# Altium PCB 2026-11-21_20-42-41.PcbDoc
Units mil, origin at the board's own origin, x right, y up, seen from the top; angles counter-clockwise.
Board outline 1801 x 1800 mil, 4 copper layers (Top Layer, MidLayer1, MidLayer2, Bottom Layer); 14 components, 8 nets, 39 pads, 58 vias.
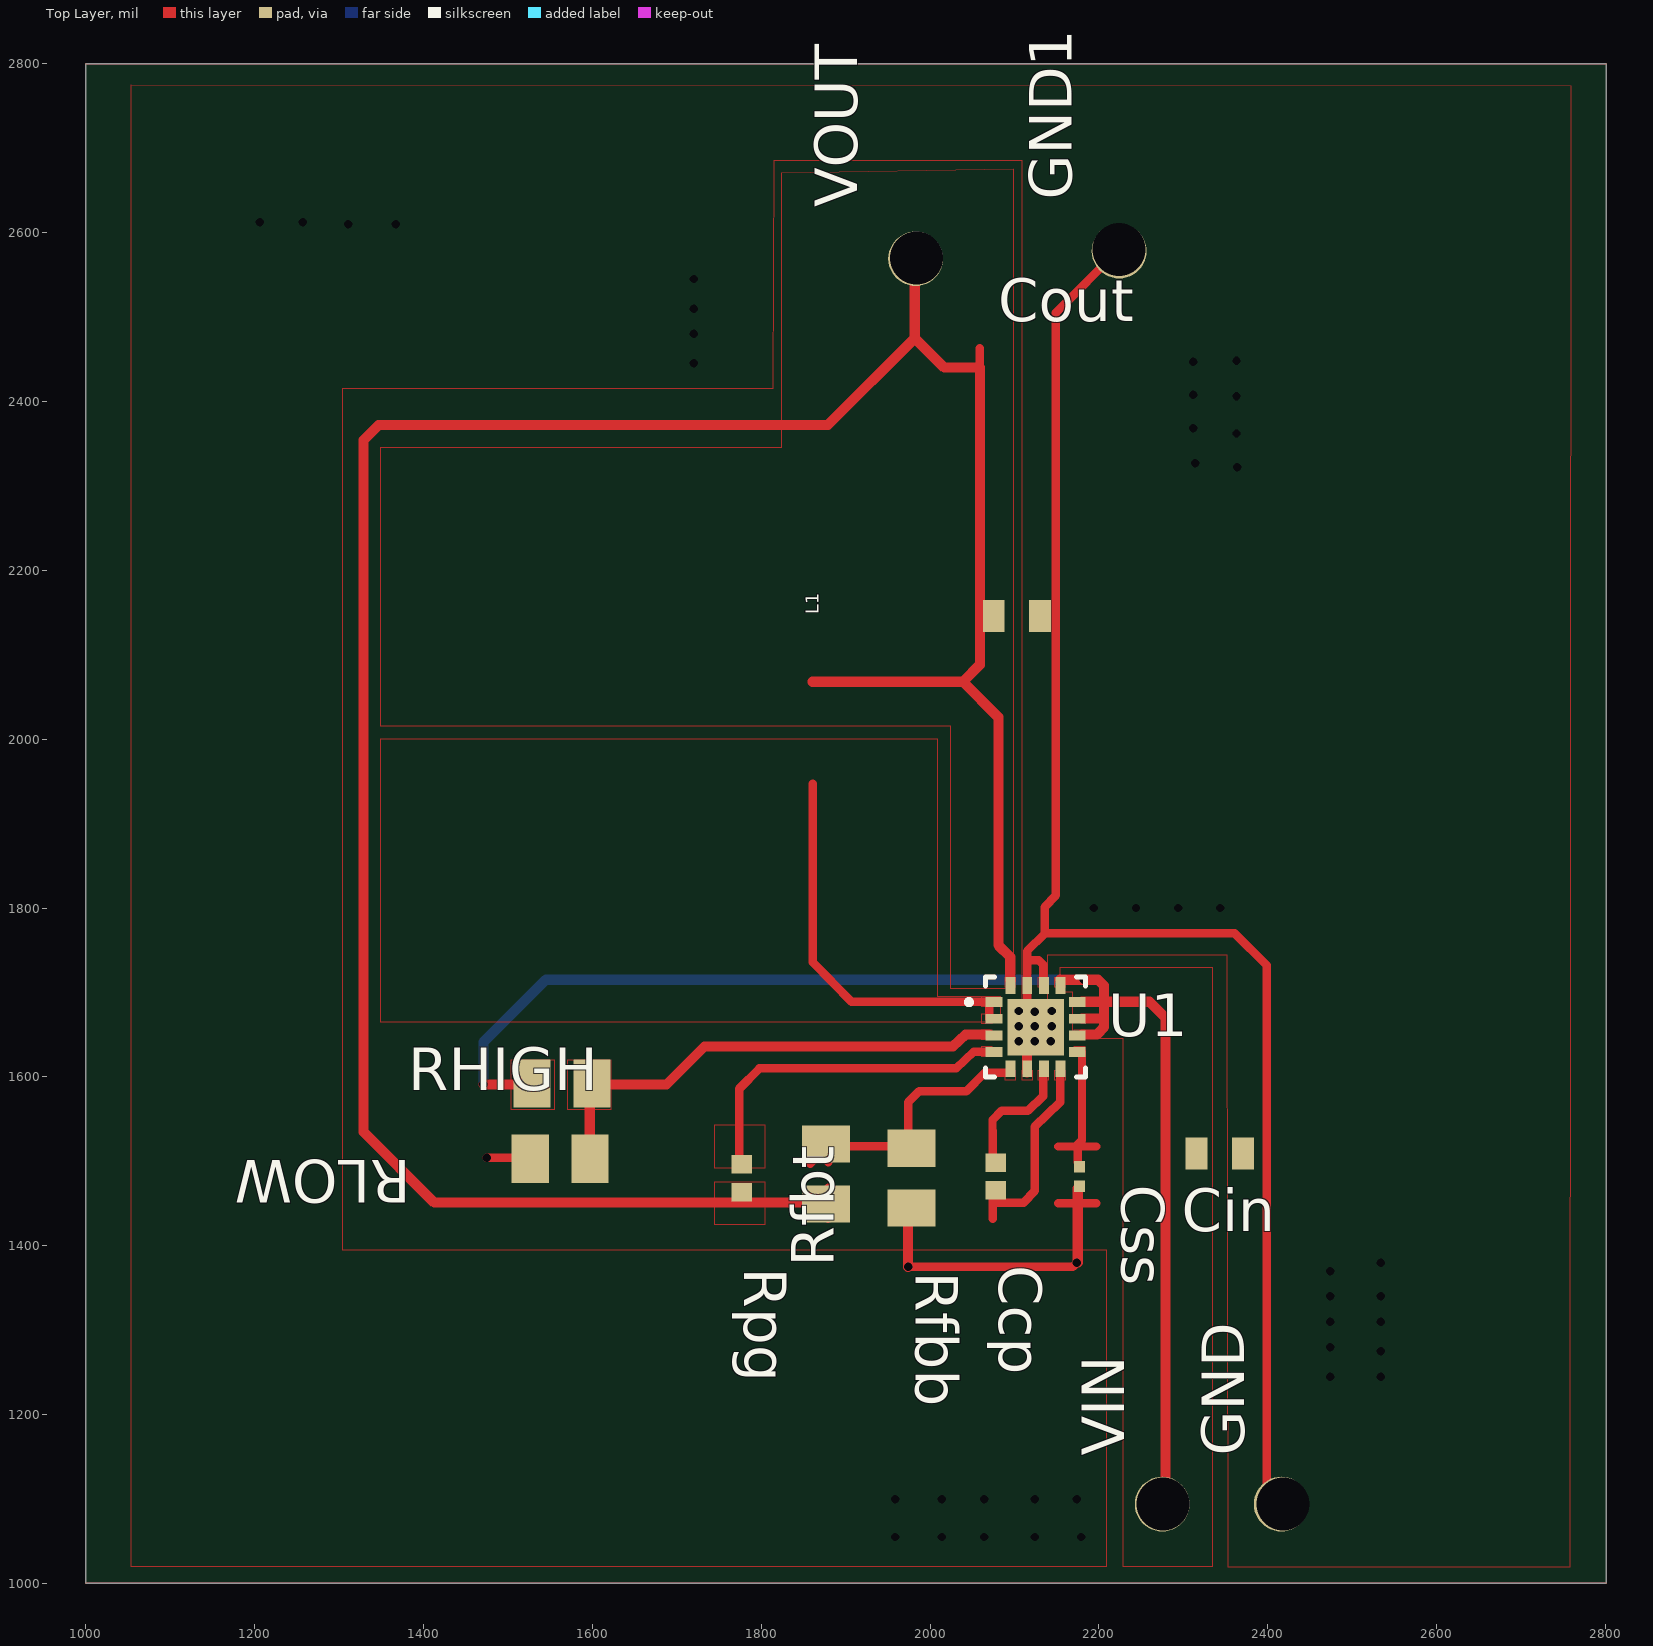
[diagram p0: Top Layer view]
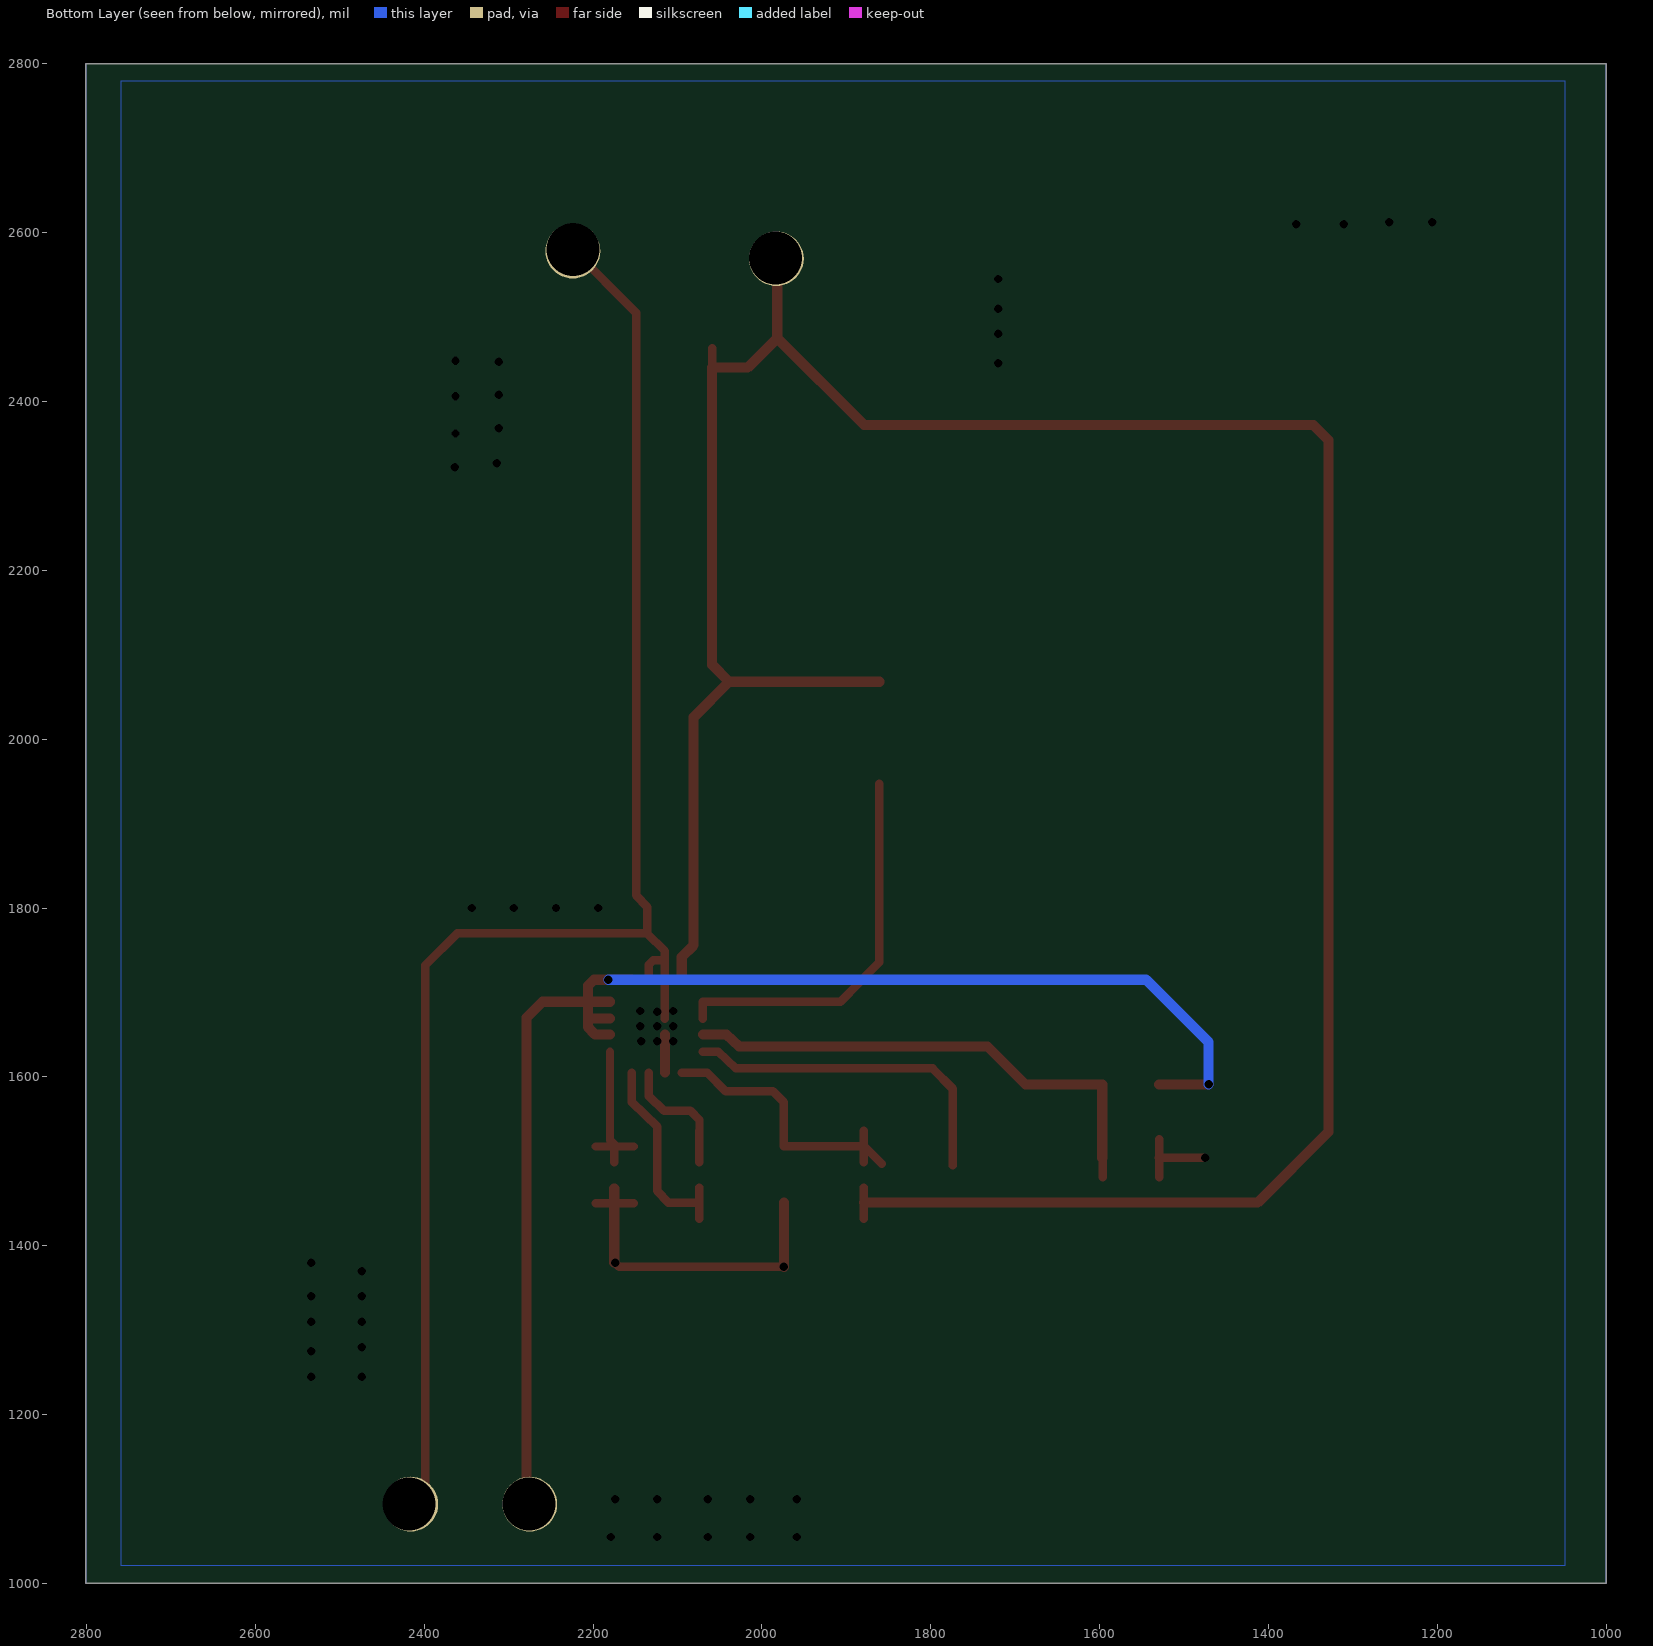
[diagram p1: Bottom Layer view, seen from below]

## Layer stack, top to bottom
Top Layer: signal copper 1.4
Dielectric: core 12.6, FR-4, Dk 4.8
MidLayer1: signal copper 1.4
Dielectric: prepreg 12.6, FR-4, Dk 4.8
MidLayer2: signal copper 1.4
Dielectric: core 12.6, FR-4, Dk 4.8
Bottom Layer: signal copper 1.4

## Board outline
1000,1000 2801,1000 2801,2800 1000,2800

## Design rules (kind name [scope] priority, off if disabled: settings)
PlaneConnect [All] p0: scope1count=1 scope1_0_kind=Board scope1_0_value=Board scope2count=1 scope2_0_kind=Board scope2_0_value=Board commentlength=0 planeconnectstyle=Direct reliefexpansion=20 reliefentries=4 reliefconductorwidth=10 reliefairgap=10
PlaneConnect [All] p1: planeconnectstyle=Direct reliefexpansion=20 reliefentries=4 reliefconductorwidth=10 reliefairgap=10
PolygonConnect [All] p0: scope1count=1 scope1_0_kind=Board scope1_0_value=Board scope2count=1 scope2_0_kind=Board scope2_0_value=Board commentlength=0 connectstyle=Direct reliefconductorwidth=10 reliefentries=4 polygonreliefangle="90 Angle"
PolygonConnect [All] p1: connectstyle=Direct reliefconductorwidth=10 reliefentries=4 polygonreliefangle="90 Angle"

## Components (designator, comment, footprint, x,y, rotation, side; value= is the part's Value field where it differs from the comment)
Ccp "" 0402 2078,1482 r270 top
Cin "" 0603 2343,1509 r0 top
Cout "" 0603 2103,2146 r0 top
Css "" 0201 2177,1482 r270 top
GND "" TP-1502 2416,1094 r90 top
GND1 "" TP-1502 2224,2578 r90 top
Rfbb "" 0805 1978,1480 r270 top
Rfbt "" 0805 1877,1485 r90 top
RHIGH "" 0805 1564,1592 r0 top
RLOW "" 0805 1562,1503 r180 top
Rpg "" 0402 1777,1480 r270 top
U1 "" S-PVQFN-N16 2125,1659 r0 top
VIN "" TP-1502 2275,1094 r90 top
VOUT "" TP-1502 1983,2569 r90 top

## Footprints (in the part's own frame and the unit in brackets; to place one, negate y for a bottom-side part, rotate by r counter-clockwise, add the part's x,y. Pads: shape width x height; smd on the part's side, far side on the other; paste and mask are expansions set on the pad)
0201 [mil]
  rect 14x13 smd: 1(-11.5,0) 2(11.5,0)
0402 [mil]
  rect 22x24 smd: 1(-16.5,0) 2(16.5,0)
0603 [mil]
  rect 26x38 smd: 1(-27.5,0) 2(27.5,0)
0805 [mil]
  rect 44x57 smd: 1(-35.5,0) 2(35.5,0)
S-PVQFN-N16 [mm]
  rect 0.5x0.3 smd: 1(-1.25,0.75) 2(-1.25,0.25) 3(-1.25,-0.25) 4(-1.25,-0.75) 9(1.25,-0.75) 10(1.25,-0.25) 11(1.25,0.25) 12(1.25,0.75)
  rect 0.3x0.5 smd: 5(-0.75,-1.25) 6(-0.25,-1.25) 7(0.25,-1.25) 8(0.75,-1.25) 13(0.75,1.25) 14(0.25,1.25) 15(-0.25,1.25) 16(-0.75,1.25)
  rect 1.7x1.7 smd: 17(0,0)
  silkscreen extent -2.08,-1.5 1.5,1.5
TP-1502 [mil]
  round 65 hole 32: 1(0,0)

## Via types
v1: diameter 0, hole 10, Top Layer to Bottom Layer, 54 vias
v2: diameter 0, hole 63, Top Layer to Bottom Layer, 4 vias

## Nets (pads, with @x,y where several pads share a name; then routed paths per layer and width w, separated by ;. In a path a pad name is that pad's centre, name@x,y a point inside that pad or via, vN(x,y) a via of type N, cw(c..) or ccw(c..) an arc to the next point about the centre after c; other vN are vias at no path point)
0: Cin.2 Cout.2 Css.2 GND1.1 GND.1 Rfbb.1 Rfbb.2 Rfbt.2 RLOW.2 U1.5 U1.6 U1.14 U1.15 U1.17 | length 2844.9
  Top Layer w10: v1(1475,1504) RLOW.2@1530,1504 ; RLOW.2@1529.5,1481 RLOW.2@1529.5,1526 ; 1858,1497 1879,1518 1974,1518 1974,1570 1987,1583 2043,1583 2065,1605 U1.5@2095,1605 ; Rfbt.2@1879.5,1499 Rfbt.2@1879.5,1536 ; v1(1974,1375) 2169,1375 v1(2174,1380) 2175,1380 ; U1.17@2115,1669 2115,1715 2115,1738 ; U1.14@2134,1715 2134,1733 2129,1738 2115,1738 ; 2149,2417 2149,2463 ; 2152,1450.5 2197,1450.5 ; v2(2224,2580) 2149,2505 2149,2440 2149,1815 2136,1801 2136,1770 ; GND.1@2399,1113 2399,1334 2399,1732 2361,1770 2136,1770 ; 2115,1738 2115,1749 2136,1770
  Top Layer w12: v1(1974,1375) Rfbb.2@1974,1451 ; U1.6@2115,1605 U1.17@2115,1650 ; 2175,1380 2175,1451 Css.2@2175,1468
  other v1: 1959,1055 2014,1055 2064,1055 2124,1055 2179,1055 1959,1100 2014,1100 2064,1100 2124,1100 2174,1100 2474,1245 2534,1245 2534,1275 2474,1280 2474,1310 2534,1310 2474,1340 2534,1340 2474,1370 2534,1380 2105,1642 2124,1642 2143,1642 2105,1660 2124,1660 2144,1660 2124,1677 2105,1678 2144,1678 2194,1800 2244,1800 2294,1800 2344,1800 2364,2322 2314,2327 2363,2362 2312,2368 2363,2406 2312,2408 1720,2445 2312,2447 2363,2448 1720,2480 1720,2510 1720,2545 1311,2610 1367,2610 1206,2612 1257,2612
  other v2: 2418,1094
1: Cin.1 RHIGH.1 RHIGH.2 RLOW.1 U1.3 U1.10 U1.11 U1.12 U1.13 VIN.1 | length 2318.6
  Top Layer w10: RLOW.1@1596.5,1481 RLOW.1@1596.5,1526
  Top Layer w12: v1(1471,1591) RHIGH.1@1530,1591 ; RLOW.1@1597,1504 1597,1591 1688,1591 1733,1636 2027,1636 2042,1650 U1.3@2070,1650 ; U1.13@2154,1715 v1(2182,1715) 2199,1715 2206,1708 2206,1689 ; U1.10@2180,1650 2198,1650 2206,1659 2206,1689 ; U1.11@2180,1669 2205,1669 ; U1.12@2180,1689 2206,1689 ; VIN.1@2279,1097 2279,1334 2279,1670 2260,1689 2206,1689
  Bottom Layer w12: v1(1471,1591) 1471,1641 1545,1715 v1(2182,1715)
  other v2: 2276,1094
2: Ccp.1 U1.7 | length 167.3
  Top Layer w10: 2074,1518 2074,1549 2085,1560 2116,1560 2134,1577 U1.7@2134,1605 ; Ccp.1@2074.5,1499 2074.5,1536
3: Ccp.2 U1.8 | length 244.8
  Top Layer w10: 2074,1451 2111,1451 2124,1465 2124,1541 2154,1570 ; 2074.5,1432 Ccp.2@2074.5,1469 ; 2154,1571 U1.8@2154,1605
4: Cout.1 Rfbt.1 Rpg.2 U1.16 VOUT.1 | length 3306.5
  Top Layer w10: Rfbt.1@1879.5,1432 Rfbt.1@1879.5,1469 ; 2059,2417 2059,2463
  Top Layer w12: 1861,2068 2039,2068 ; Rfbt.1@1879,1451 1774,1451 1413,1451 1329,1535 1329,2354 1347,2372 1879,2372 1982,2475 ; v2(1984,2570) 1982,2567 1982,2475 ; 2054,2440 2017,2440 1982,2475 ; 2059,2440 2059,2088 2039,2068 ; U1.16@2095,1715 2095,1742 2081,1756 2081,2026 2039,2068
5: Rpg.1 U1.4 | length 404.9
  Top Layer w10: Rpg.1@1774,1495 1774,1518 1774,1586 1798,1610 2031,1610 2052,1630 U1.4@2070,1630
6: Css.1 U1.9 | length 176.1
  Top Layer w10: 2152,1517.5 2197,1517.5 ; Css.1@2175,1499 2175,1518 ; 2175,1520 2180,1525 U1.9@2180,1630
7: U1.1 U1.2 | length 459.8
  Top Layer w10: 1861,1947 1861,1736 1907,1689 2070,1689 U1.2@2070,1669

## Polygon pours and split planes (outlines as drawn)
4 on Top Layer " " (solid, pour order 0): 2089,1706 2089,1718 2101,1718 2101,1706
1 on Top Layer " " (solid, pour order 1): 2148,1706 2148,1718 2160,1718 2160,1706
1 on Top Layer " " (solid, pour order 2): 2171,1644 2171,1656 2183,1656 2183,1644
6 on Top Layer " " (solid, pour order 3): 2171,1624 2171,1636 2183,1636 2183,1624
3 on Top Layer " " (solid, pour order 4): 2148,1596 2148,1608 2160,1608 2160,1596
2 on Top Layer " " (solid, pour order 5): 2128,1596 2128,1608 2140,1608 2140,1596
5 on Top Layer " " (solid, pour order 6): 2061,1624 2061,1636 2073,1636 2073,1624
1 on Top Layer " " (solid, pour order 7): 2061,1644 2061,1656 2073,1656 2073,1644
7 on Top Layer " " (solid, pour order 8): 2061,1663 2061,1675 2073,1675 2073,1663
7 on Top Layer " " (solid, pour order 9): 2061,1683 2061,1695 2073,1695 2073,1683
4 on Top Layer " " (solid, pour order 10): 1745,1425 1745,1476 1804,1476 1804,1425
5 on Top Layer " " (solid, pour order 11): 1745,1492 1745,1543 1804,1543 1804,1492
1 on Top Layer " " (solid, pour order 12): 1571,1561 1571,1620 1622,1620 1622,1561
1 on Top Layer " " (solid, pour order 13): 1504,1561 1504,1620 1555,1620 1555,1561
7 on Top Layer " " (solid, pour order 14): 1349,1665 2084,1665 2084,1695 2009,1695 2009,2000 1349,2000
1 on Top Layer " " (solid, pour order 15): 2334,1020 2229,1020 2229,1645 2169,1645 2169,1700 2154,1700 2154,1730 2334,1730
4 on Top Layer " " (solid, pour order 16): 2099,1705 2099,2675 1824,2670 1824,2426 1824,2345 1349,2345 1349,2016 2024,2016 2024,1705
0 on Top Layer " " (solid, pour order 17): 2095,1630 2095,1690 2155,1690 2155,1630
0 on Top Layer " " (solid, pour order 18): 2128,1706 2128,1718 2140,1718 2140,1706
0 on Top Layer " " (solid, pour order 19): 2109,1596 2109,1608 2121,1608 2121,1596
0 on Top Layer " " (solid, pour order 20): 2089,1596 2089,1608 2101,1608 2101,1596
0 on Top Layer " " (solid, pour order 21): 1054,2775 2759,2774 2758,1019 2353,1019 2352,1744 2139,1744 2139,1690 2154,1690 2154,1630 2094,1630 2094,1690 2109,1690 2109,2685 1815,2685 1814,2415 1304,2415 1304,1395 2209,1395 2209,1020 1054,1020
0 on Bottom Layer " " (solid, pour order 22): 1049,1021 2759,1021 2759,2780 1049,2780

## Other copper
Multi-Layer:
  the board outline again, w1

## Silkscreen, mask and mechanical layers (free items; w line width, h text height)
Top Overlay:
  text "L1" at 1868,2148 h15 r90